# Altium PCB W5500-EVB-Pico2_V100.PcbDoc
Units mm, origin at the board's own origin, x right, y up, seen from the top; angles counter-clockwise.
Board outline 80 x 21 mm, 4 copper layers (Top Layer, Internal Plane 1 (Gnd), Internal Plane 2 (Vcc), Bottom Layer), stack 1.6 mm thick; 103 components, 95 nets, 455 pads, 192 vias.
Unrouted connection lines stored in the file: 78.
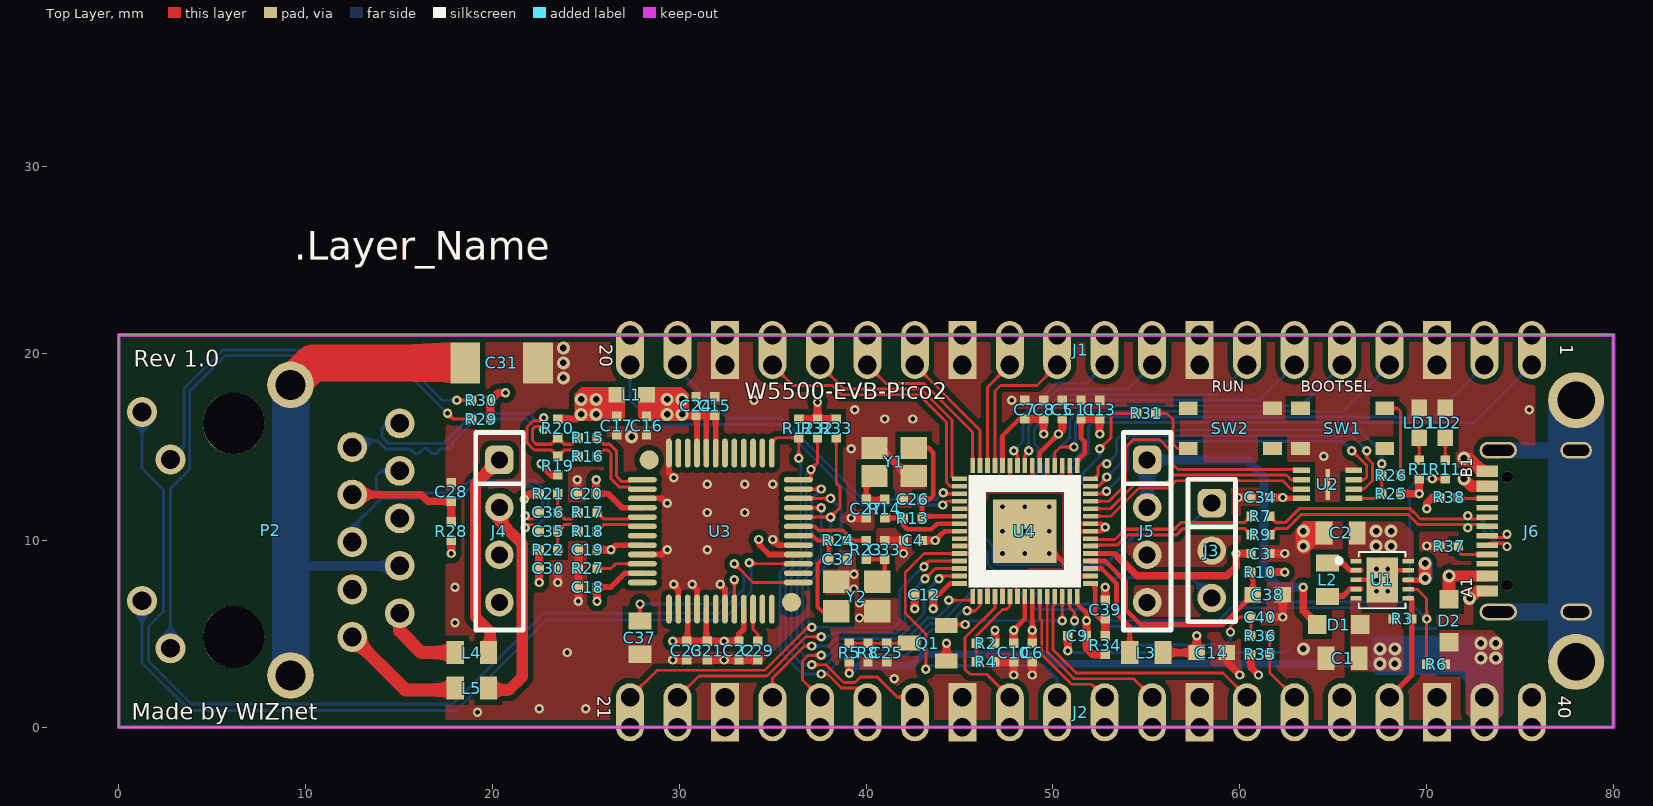
[diagram p0: Top Layer view]
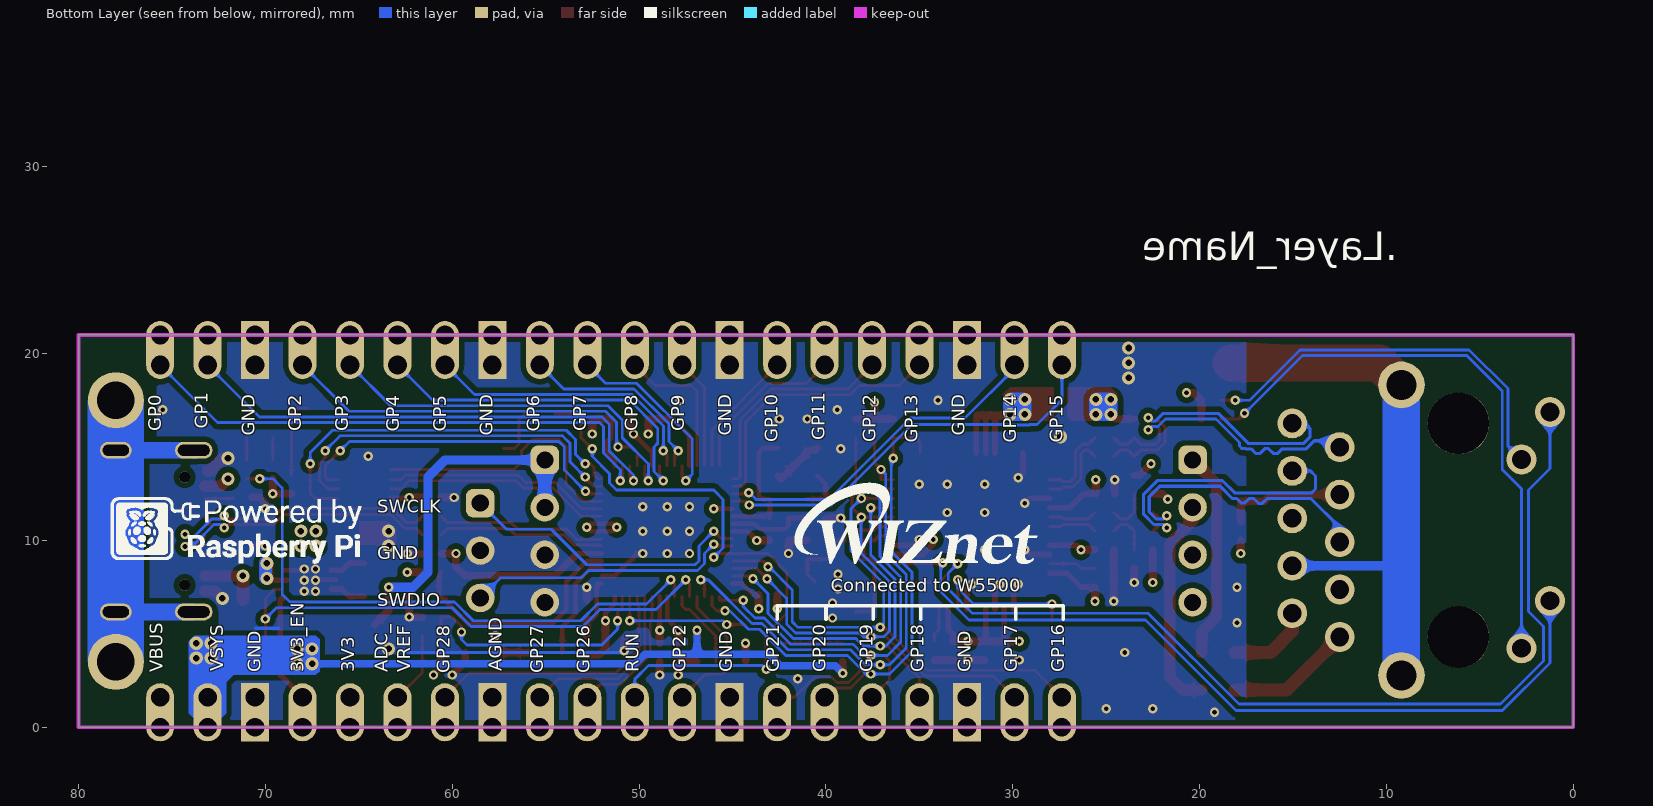
[diagram p1: Bottom Layer view, seen from below]
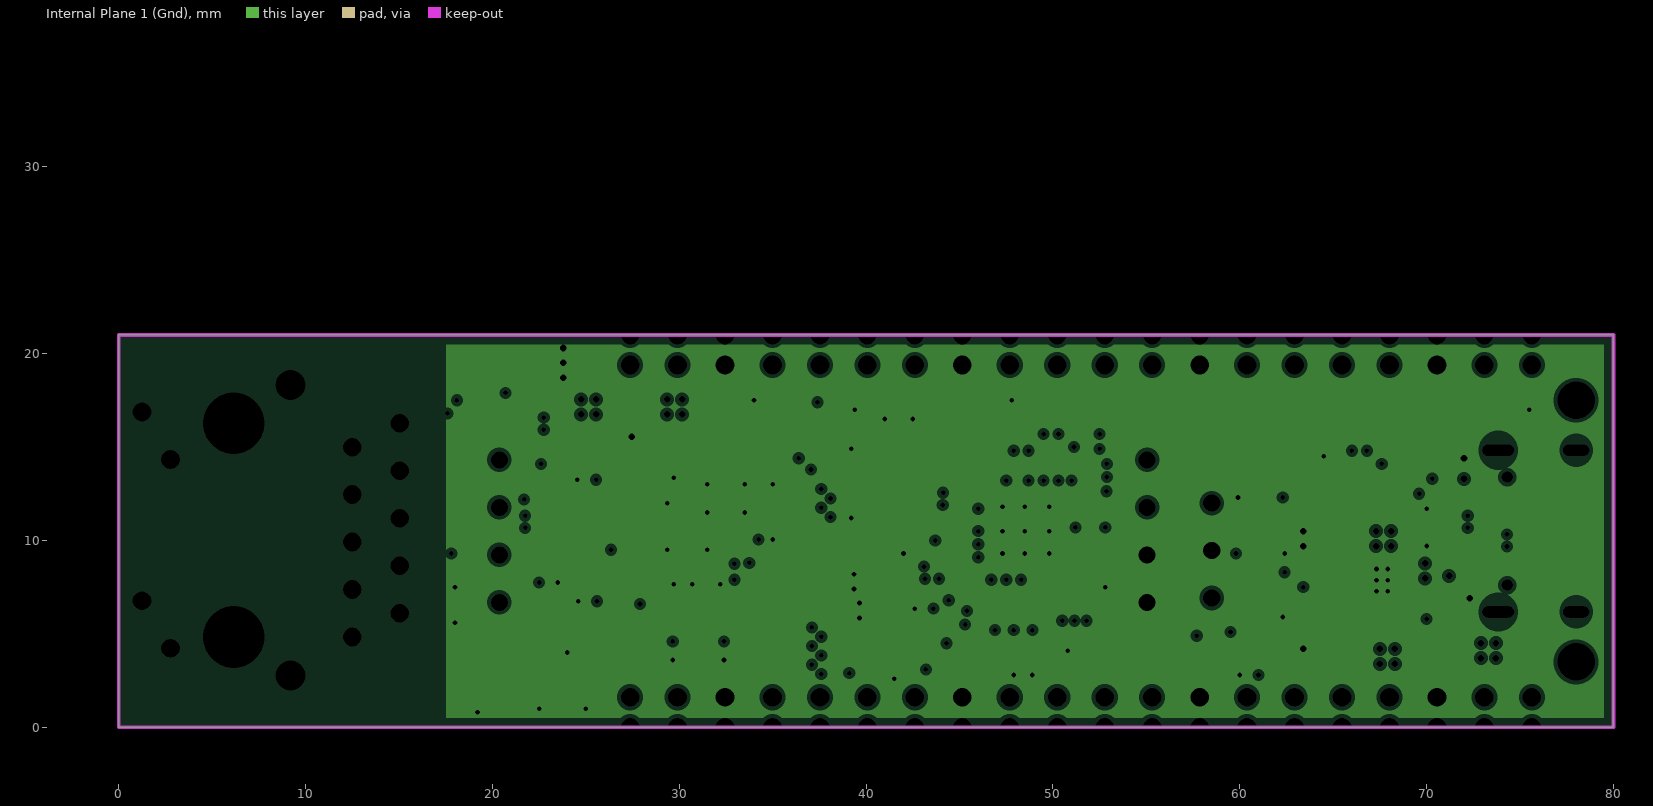
[diagram p2: Internal Plane 1 (Gnd), clearances drawn from the general rule]
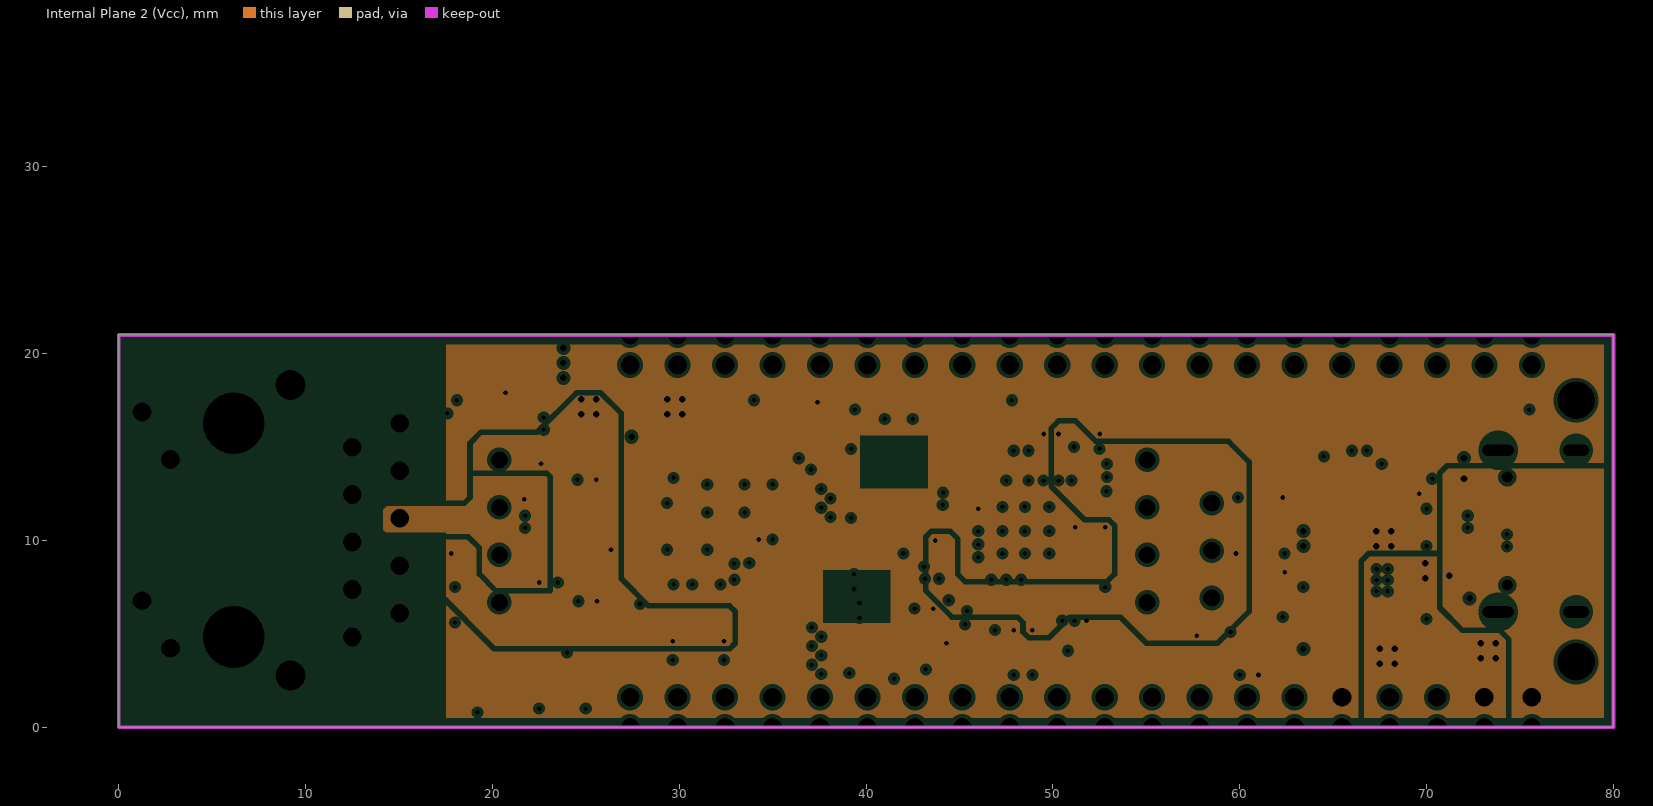
[diagram p3: Internal Plane 2 (Vcc), clearances drawn from the general rule]
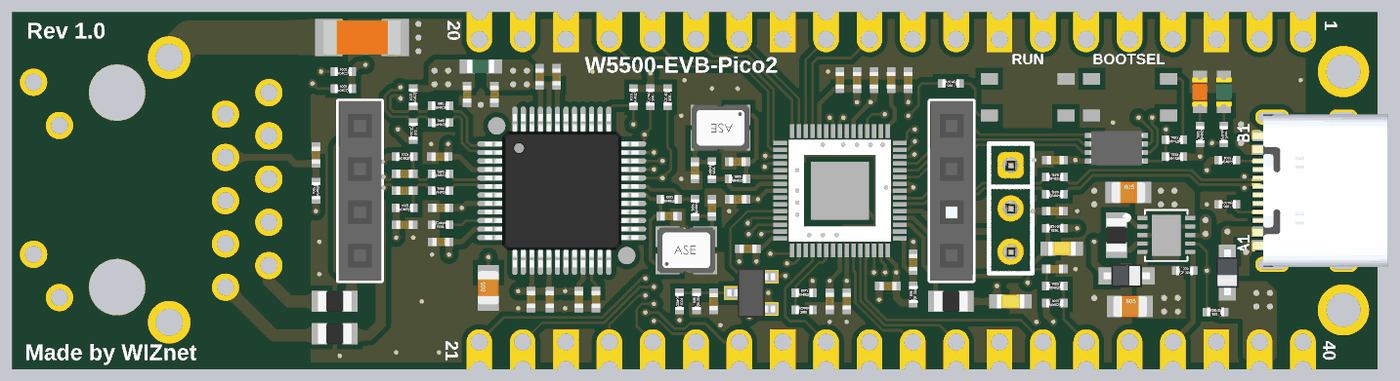
[diagram p4: 3D render of the assembled board from above, using the file's embedded part models]

## Layer stack, top to bottom
Top Solder: solder mask 0.01, Solder Resist, Dk 3.5
Top Layer: signal copper 0.05
Dielectric 1: prepreg 0.1, PP-006, Dk 4.1
Internal Plane 1 (Gnd): plane copper 0.1, net VREG_PGND
Dielectric1: prepreg 1.1, FR-4, Dk 4.8
Internal Plane 2 (Vcc): plane copper 0.1, net (Multiple Nets)
Dielectric 2: prepreg 0.1, PP-006, Dk 4.1
Bottom Layer: signal copper 0.05
Bottom Solder: solder mask 0.01, Solder Resist, Dk 3.5

## Board outline
0,0 80,0 80,21 0,21

## Design rules (kind name [scope] priority, off if disabled: settings)
BoardOutlineClearance [All] p1: gap=0.3 ignorepadtopadclearanceinfootprint=FALSE
Clearance [All] p1: gap=0.15 ignorepadtopadclearanceinfootprint=FALSE except(0.2: Arc-Hole Track-Hole SMDPad-Hole THPad-Hole Via-Hole Fill-Hole Poly-Hole Region-Hole Text-Hole; 0.3: Arc-Poly Track-Poly SMDPad-Poly THPad-Poly Via-Poly Fill-Poly Poly-Poly Poly-Region Poly-Text)
DiffPairsRouting [All] p1: maxlimit=0.135 minlimit=0.135 mostfreqgap=0.135 toplayer_minwidth=0.165 toplayer_maxwidth=0.165 toplayer_prefwidth=0.165 bottomlayer_minwidth=0.165 bottomlayer_maxwidth=0.165 bottomlayer_prefwidth=0.165 maxuncoupledlength=15.24
HoleSize [All] p1: absolutevalues=TRUE maxlimit=4.064 minlimit=0.025 maxpercent=80.000 minpercent=20.000
PlaneClearance [All] p1: clearance=0.2
PlaneConnect [All] p1: planeconnectstyle=Direct reliefexpansion=0.508 reliefentries=4 reliefconductorwidth=0.254 reliefairgap=0.254
PolygonConnect [All] p1: connectstyle=Direct reliefconductorwidth=0.6 reliefentries=4 polygonreliefangle="45 Angle" airgapwidth=0.35
RoutingVias [All] p1: holewidth=0.25 width=0.5 viastyle="Through Hole" minholewidth=0.2 minwidth=0.4 maxholewidth=0.4 maxwidth=0.8
SolderMaskExpansion [All] p1: expansion=0 istentingtop=FALSE
Width [All] p1: maxlimit=10 minlimit=0.075 preferedwidth=0.15
26 further rules are at their usual default settings.

## Classes and differential pairs
differential pair NewDifferentialPair4: +NetP2_R1 -NetP2_R2
differential pair NewDifferentialPair1: +NetC35_2 -NetC36_2

## Components (designator, comment, footprint, x,y, rotation, side; value= is the part's Value field where it differs from the comment)
C1 "10u" CAP-0805 65.5,3.7 r0 top
C2 "47u" CAP-0805 65.4,10.4 r0 top
C3 "0.1uF" CAP-0402 61.1,9.3 r180 top
C4 "1uF" CAP-0402 42.5,10 r0 top
C5 "0.1uF" CAP-0402 50.5,17 r270 top
C6 "0.1uF" CAP-0402 48.9,4 r90 top
C7 "1uF" CAP-0402 48.5,17 r270 top
C8 "0.1uF" CAP-0402 49.5,17 r270 top
C9 "0.1uF" CAP-0402 51.3,4.9 r0 top
C10 "0.1uF" CAP-0402 47.9,4 r90 top
C11 "0.1uF" CAP-0402 51.5,17 r270 top
C12 "0.1uF" CAP-0402 43.1,7.1 r0 top
C13 "0.1uF" CAP-0402 52.5,17 r270 top
C14 "10uF/1608" CAP-0603 58.5,4 r180 top
C15 "0.1uF" CAP-0402 31.9,17.2 r270 top
C16 "0.1uF" CAP-0402 28.25,16.15 r90 top locked
C17 "1uF" CAP-0402 26.65,16.15 r90 top locked
C18 "0.1uF" CAP-0402 25.1,7.5 r0 top locked
C19 "0.1uF" CAP-0402 25.1,9.5 r0 top locked
C20 "1uF" CAP-0402 25.05,12.5 r0 top locked
C21 "0.1uF" CAP-0402 31.5,4.1 r90 top
C22 "0.1uF" CAP-0402 33.2,4.1 r90 top
C23 "0.1uF" CAP-0402 30.4,4.1 r90 top
C24 "1uF" CAP-0402 30.9,17.2 r270 top
C25 "0.1uF" CAP-0402 41.1,4 r270 top
C26 "15pF" CAP-0402 42.5,12.2 r180 top
C27 "15pF" CAP-0402 40,11.7 r270 top
C28 "22nF" CAP-0402 17.8,12.6 r270 top locked
C29 "0.1uF" CAP-0402 34.2,4.1 r90 top
C30 "0.1uF" CAP-0402 23,8.5 r180 top locked
C31 "1nF/2kV" CAP-1808 20.5,19.5 r0 top locked
C32 "18pF" CAP-0402 38.5,9 r180 top
C33 "18pF" CAP-0402 41,9.5 r270 top
C34 "0.1uF" CAP-0402 61.1,12.3 r0 top
C35 "6.8nF" CAP-0402 23,10.5 r180 top locked
C36 "6.8nF" CAP-0402 23,11.5 r180 top locked
C37 "4.7uF" CAP-0805 27.9,4.8 r90 top locked
C38 "10uF/1608" CAP-0603 61.5,7.1 r180 top
C39 "2u2" CAP-0402 52.8,6.3 r270 top
C40 "2u2" CAP-0402 61.1,5.9 r180 top
D1 "BAT60A" SOD-323(1-C,2-A) 65.3,5.5 r180 top
D2 "BAT60A" SOD-323(1-C,2-A) 71.2,5.7 r90 top
J1 "2.54mm 1x20 Pin Header DIP" IDC-1X20 75.63,19.39 r180 top
J2 "2.54mm 1x20 Pin Header DIP" IDC-1X20 27.37,1.61 r0 top
J3 "2.54mm 1x3 Pin Header DIP" IDC-1X3 58.5,12 r270 top
J4 "Header Socket 1x4_2.54mm" IDC-1X4(SOCKET) 20.375,14.31 r270 top locked
J5 "Header Socket 1x4_2.54mm" IDC-1X4(SOCKET) 55.044,14.31 r270 top
J6 "*" USB-TYPE-C-31-M-12 78,10.5 r90 top
L1 "HH-1M1608-121JT" IND-0603 27.45,17.8 r180 top locked
L2 "2u2" IND-0805 64.7,7.9 r90 top
L3 "3u3" IND-0805 55,4 r0 top
L4 "0R" IND-0805 18.9,4 r0 top locked
L5 "0R" IND-0805 18.9,2.1 r0 top locked
LD1 "Red" LED-0603-RED 69.6,16.3 r90 top
LD2 "Green" LED-0603-GREEN 71,16.3 r90 top
P2 "RB1-ZZ-0049" RB1-ZZ-0049 6.15,10.55 r270 top locked
Q1 "Q-2N7002" SOT23-3L 43.3,4.5 r90 top
R1 "470R" RES-0402 69.6,13.8 r90 top
R2 "5.6K" RES-0402 46.4,4.5 r0 top
R3 "100K" RES-0402 68.7,5.8 r0 top
R4 "10K" RES-0402 46.4,3.5 r180 top
R5 "200K" RES-0402 39.1,4 r270 top
R6 "100K" RES-0402 70.51,3.378 r180 top
R7 "27R" RES-0402 61.1,11.3 r0 top
R8 "100K" RES-0402 40.1,4 r90 top
R9 "27R" RES-0402 61.1,10.3 r0 top
R10 "0R" RES-0402 61.1,8.3 r180 top
R11 "470R" RES-0402 71,13.8 r270 top
R12 "4.7K" RES-0402 36.4,16 r90 top
R13 "NC" RES-0402 42.5,11.2 r0 top
R14 "1K" RES-0402 41,11.7 r270 top
R15 "3.3R" RES-0402 25.1,15.5 r0 top locked
R16 "3.3R" RES-0402 25.1,14.5 r0 top locked
R17 "3.3R" RES-0402 25.1,11.5 r0 top locked
R18 "3.3R" RES-0402 25.1,10.5 r0 top locked
R19 "49.9R" RES-0402 23.5,14 r270 top locked
R20 "49.9R" RES-0402 23.5,16 r90 top locked
R21 "49.9R" RES-0402 23,12.5 r0 top locked
R22 "49.9R" RES-0402 23,9.5 r0 top locked
R23 "0R" RES-0402 40,9.5 r90 top
R24 "1M" RES-0402 38.5,10 r0 top
R25 "NC" RES-0402 68.1,12.5 r0 top
R26 "1K" RES-0402 68.1,13.5 r0 top
R27 "12.4K/1%" RES-0402 25.1,8.5 r180 top locked
R28 "10R/1%" RES-0402 17.8,10.5 r90 top locked
R29 "330R" RES-0402 19.4,16.5 r0 top locked
R30 "330R" RES-0402 19.4,17.5 r0 top locked
R31 "1K" RES-0402 55,16.8 r180 top
R32 "4.7K" RES-0402 37.4,16 r270 top
R33 "4.7K" RES-0402 38.4,16 r270 top
R34 "10R" RES-0402 52.8,4.4 r90 top
R35 "200R" RES-0402 61.1,3.9 r0 top
R36 "1R" RES-0402 61.1,4.9 r0 top
R37 "5.1k" RES-0402 71.2,9.7 r180 top
R38 "5.1k" RES-0402 71.2,12.3 r0 top
SW1 "RKB2SJK250SMTR LFS" SW-RKB2 65.5,16 r0 top
SW2 "RKB2SJK250SMTR LFS" SW-RKB2 59.5,16 r180 top
U1 "SGM62112-3.3" SGM62112 67.618,7.875 r0 top
U2 "W25Q16JVUXIQ" SON50P300X200X60-9N 64.7,13 r180 top
U3 "W5500" LQFP48(0.5/9.0) 32.2,10.5 r0 top
U4 "RP2350-A" QFN60(0.4/7X7) 48.5,10.5 r270 top
Y1 "12MHz" OSC-TZ1067B 41.5,14.2 r180 top
Y2 "25MHz" OSC-82J0626 39.5,7 r0 top

## Footprints (in the part's own frame and the unit in brackets; to place one, negate y for a bottom-side part, rotate by r counter-clockwise, add the part's x,y. Pads: shape width x height; smd on the part's side, far side on the other; paste and mask are expansions set on the pad)
CAP-0402 [mm]
  rect 0.5x0.5 smd: 1(-0.5,0) 2(0.5,0)
  body extent -0.48,-0.25 0.52,0.25, height 0.6
CAP-0603 [mm] "Ceramic CAP 0603(1608)"
  rect 0.89x0.82 smd: 1(-0.8,0) 2(0.8,0)
  body extent -0.93,-0.41 0.93,0.41, height 0.81
CAP-0805 [mil]
  rect 36x49 smd: 1(-35,0)
  rect 35.43x49 smd: 2(35,0)
  body extent -39,-24 40,25, height 31
CAP-1808 [mm] "Ceramic CAP 1808(4520)"
  rect 1.6x2.2 smd: 1(-1.95,0) 2(1.95,0)
  body extent -2.25,-1.02 2.25,1.01, height 2
IDC-1X3 [mil]
  rrect50% 60x60 hole 36: 1(0,0)
  round 60 hole 36: 2(100,0) 3(200,0)
  silkscreen extent -50,-50 250,50, body extent -49,-49 251,51, height 336
IDC-1X4(SOCKET) [mil]
  rrect50% 60x60 hole 36: 1(0,0)
  round 60 hole 36: 2(100,0) 3(200,0) 4(300,0)
  silkscreen extent -58,-50 358,50, body extent -58,-49 358,49, height 341
IDC-1X20 [mm]
  oval 1.5x2.5 hole 1 copper offset 0,-0.5: 1(0,0) 2(2.54,0) 4(7.62,0) 5(10.16,0) 6(12.7,0) 7(15.24,0) 9(20.32,0) 10(22.86,0) 11(25.4,0) 12(27.94,0) 14(33.02,0) 15(35.56,0) 16(38.1,0) 17(40.64,0) 19(45.72,0) 20(48.26,0)
  oval 1.5x2.5 hole 1 copper offset 0,0.5: 1(0,-1.61) 2(2.54,-1.61) 4(7.62,-1.61) 5(10.16,-1.61) 6(12.7,-1.61) 7(15.24,-1.61) 9(20.32,-1.61) 10(22.86,-1.61) 11(25.4,-1.61) 12(27.94,-1.61) 14(33.02,-1.61) 15(35.56,-1.61) 16(38.1,-1.61) 17(40.64,-1.61) 19(45.72,-1.61) 20(48.26,-1.61)
  rect 1.5x2.5 hole 1 copper offset 0,0.5: 3(5.08,-1.61) 8(17.78,-1.61) 13(30.48,-1.61) 18(43.18,-1.61)
  rect 1.5x2.5 hole 1 copper offset 0,-0.5: 3(5.08,0) 8(17.78,0) 13(30.48,0) 18(43.18,0)
IND-0603 [mm] "Inductor 0603(1608)"
  rect 0.89x0.82 smd: 1(-0.8,0) 2(0.8,0)
  body extent -0.8,-0.4 0.8,0.4, height 0.95
IND-0805 [mil]
  rect 36x49 smd: 1(-35,0)
  rect 35.43x49 smd: 2(35,0)
  Top Layer pour cut-out: -15,25 -15,-25 15,-25 15,25
  body extent -39,-24 39,24, height 37
LED-0603-GREEN [mm] "LED-0603-GREEN"
  rect 0.89x0.82 smd: 1(-0.8,0) 2(0.8,0)
  body extent -0.85,-0.45 0.85,0.45, height 0.9
LED-0603-RED [mm] "LED-0603-RED"
  rect 0.89x0.82 smd: 1(-0.8,0) 2(0.8,0)
  body extent -0.85,-0.45 0.85,0.45, height 0.9
LQFP48(0.5/9.0) [mm]
  round 1.016 smd: 0(-3.81,3.81) 0(3.81,-3.81)
  oval 1.55x0.3 smd: 1(-4.175,2.75) 2(-4.175,2.25) 3(-4.175,1.75) 4(-4.175,1.25) 5(-4.175,0.75) 6(-4.175,0.25) 7(-4.175,-0.25) 8(-4.175,-0.75) 9(-4.175,-1.25) 10(-4.175,-1.75) 11(-4.175,-2.25) 12(-4.175,-2.75) 25(4.175,-2.75) 26(4.175,-2.25) 27(4.175,-1.75) 28(4.175,-1.25) 29(4.175,-0.75) 30(4.175,-0.25) 31(4.175,0.25) 32(4.175,0.75) 33(4.175,1.25) 34(4.175,1.75) 35(4.175,2.25) 36(4.175,2.75)
  oval 0.3x1.55 smd: 13(-2.75,-4.175) 14(-2.25,-4.175) 15(-1.75,-4.175) 16(-1.25,-4.175) 17(-0.75,-4.175) 18(-0.25,-4.175) 19(0.25,-4.175) 20(0.75,-4.175) 21(1.25,-4.175) 22(1.75,-4.175) 23(2.25,-4.175) 24(2.75,-4.175) 37(2.75,4.175) 38(2.25,4.175) 39(1.75,4.175) 40(1.25,4.175) 41(0.75,4.175) 42(0.25,4.175) 43(-0.25,4.175) 44(-0.75,4.175) 45(-1.25,4.175) 46(-1.75,4.175) 47(-2.25,4.175) 48(-2.75,4.175)
  body extent -4.5,-4.5 4.5,4.5, height 1.5
OSC-82J0626 [mm]
  rect 1.4x1.2 smd: 1(-1.1,-0.8) 2(1.1,-0.8) 3(1.1,0.8) 4(-1.1,0.8)
  body extent -1.7,-1.35 1.7,1.35, height 1.06
OSC-TZ1067B [mm]
  rect 1.4x1.2 smd: 1(-1.05,-0.75) 2(1.05,-0.75) 3(1.05,0.75) 4(-1.05,0.75)
  body extent -1.7,-1.35 1.7,1.35, height 1.06
QFN60(0.4/7X7) [mm]
  rect 0.8x0.25 smd: 1(-3.5,2.8) 2(-3.5,2.4) 3(-3.5,2) 4(-3.5,1.6) 5(-3.5,1.2) 6(-3.5,0.8) 7(-3.5,0.4) 8(-3.5,0) 9(-3.5,-0.4) 10(-3.5,-0.8) 11(-3.5,-1.2) 12(-3.5,-1.6) 13(-3.5,-2) 14(-3.5,-2.4) 15(-3.5,-2.8) 31(3.5,-2.8) 32(3.5,-2.4) 33(3.5,-2) 34(3.5,-1.6) 35(3.5,-1.2) 36(3.5,-0.8) 37(3.5,-0.4) 38(3.5,0) 39(3.5,0.4) 40(3.5,0.8) 41(3.5,1.2) 42(3.5,1.6) 43(3.5,2) 44(3.5,2.4) 45(3.5,2.8)
  rect 0.25x0.8 smd: 16(-2.8,-3.5) 17(-2.4,-3.5) 18(-2,-3.5) 19(-1.6,-3.5) 20(-1.2,-3.5) 21(-0.8,-3.5) 22(-0.4,-3.5) 23(0,-3.5) 24(0.4,-3.5) 25(0.8,-3.5) 26(1.2,-3.5) 27(1.6,-3.5) 28(2,-3.5) 29(2.4,-3.5) 30(2.8,-3.5) 46(2.8,3.5) 47(2.4,3.5) 48(2,3.5) 49(1.6,3.5) 50(1.2,3.5) 51(0.8,3.5) 52(0.4,3.5) 53(0,3.5) 54(-0.4,3.5) 55(-0.8,3.5) 56(-1.2,3.5) 57(-1.6,3.5) 58(-2,3.5) 59(-2.4,3.5) 60(-2.8,3.5)
  rect 3.4x3.4 smd: 61(0,0)
  body extent -3.5,-3.5 3.5,3.5, height 1
RB1-ZZ-0049 [mm]
  round 3.3 hole 3.3: 0(-5.715,0) 0(5.715,0)
  round 1.6 hole 1: L1(6.325,-3.38) L2(3.785,-4.9) L3(-3.785,-3.38) L4(-6.325,-4.9) R1(-5.715,8.89) R2(-4.445,6.35) R3(-3.175,8.89) R4(-1.905,6.35) R5(-0.635,8.89) R6(0.635,6.35) R7(1.905,8.89) R8(3.175,6.35) R9(4.445,8.89) R10(5.715,6.35)
  round 2.5 hole 1.6: S1(-7.775,3.05) S2(7.775,3.05)
  Top Layer pour cut-out: -6.3,1.65 -6.3,5.4 -5.1,5.4 -5.1,1.65
  Top Layer pour cut-out: 5.13,1.65 5.13,5.4 6.33,5.4 6.33,1.65
  Top Layer pour cut-out: -2.6,-8.3 -2.6,-5.4 2.6,-5.4 2.6,-8.3
  Top Layer pour cut-out: -8.8,-7.6 8.8,-7.6 8.8,-4.6 -8.8,-4.6
  body extent -7.9,-10.9 8,10.9, height 13.35
RES-0402 [mm]
  rect 0.5x0.5 smd: 1(-0.5,0) 2(0.5,0)
  body extent -0.5,-0.25 0.5,0.25, height 0.35
SGM62112 [mm]
  rect 0.6x0.24 smd paste+0 mask+0: 1(-1.406,1.025) 2(-1.406,0.525) 3(-1.406,0.025) 4(-1.406,-0.475) 5(-1.406,-0.975) 6(1.394,-0.975) 7(1.394,-0.475) 8(1.394,0.025) 9(1.394,0.525) 10(1.394,1.025)
  rect 1.7x2.4 smd paste+0 mask+0: 9(0,0)
  silkscreen extent -2.43,-1.5 1.25,1.5
SOD-323(1-C,2-A) [mm]
  rect 1x1 smd: 1(-1.15,0) 2(1.15,0)
  body extent -1.35,-0.67 1.35,0.68, height 0.79
SON50P300X200X60-9N [mm]
  rect 0.9x0.3 smd: 1(-1.4,0.75) 2(-1.4,0.25) 3(-1.4,-0.25) 4(-1.4,-0.75) 5(1.4,-0.75) 6(1.4,-0.25) 7(1.4,0.25) 8(1.4,0.75)
  rect 0.25x1.65 smd: 9(0,0)
  body extent -1.55,-1 1.55,1, height 0.6
SOT23-3L [mm]
  rect 0.8x1.2 smd paste-0.07: 1(-0.95,-1) 2(0.95,-1) 3(0,1)
  body extent -1.45,-1.4 1.45,1.4, height 1.28
SW-RKB2 [mm]
  rect 1x0.7 smd: 1(-2.25,1.075) 2(2.25,1.075) 3(-2.25,-1.075) 4(2.25,-1.075)
  body extent -2.1,-1.6 2.1,1.6, height 2.5
USB-TYPE-C-31-M-12 [mm]
  rect 0.6x1.14 smd mask+0.05: A1_B12(-3.2,4.75) A4_B9(-2.4,4.75) B1_A12(3.2,4.75) B4_A9(2.4,4.75)
  rect 0.3x1.14 smd mask+0.05: A5(-1.25,4.75) A6(-0.25,4.75) A7(0.25,4.75) A8(1.25,4.75) B5(1.75,4.75) B6(0.75,4.75) B7(-0.75,4.75) B8(-1.75,4.75)
  oval 0.9x2 hole 0.6 slot 1.7 at 90 deg: S1(-4.325,4.17) S2(4.325,4.17)
  oval 0.9x1.7 hole 0.6 slot 1.4 at 90 deg: S3(-4.325,0) S4(4.325,0)
  round 0.6 hole 0.6 unplated: ""(-2.89,3.68) ""(2.89,3.68)
  body extent -4.47,-2.6 4.47,5.31, height 3.31

## Part data
C1 C2: library part CAP-0805, "MLCC-0805(2012)"
C3 C4 C5 C6 C7 C8 C9 C10 C11 C12 C13 C15 C16 C17 C18 C19 C20 C21 C22 C23 C24 C25 C26 C27 C28 C29 C30 C32 C33 C34 C35 C36 C39 C40: library part CAP-0402, "Ceramic CAP 0402(1005)"
C14 C38: library part CAP-0603, "MLCC-0603(1608)"
C31: library part CAP-1808, "MLCC-1808(4520)"
C37: library part CAP-0805, "Ceramic CAP 0805(2012)"
D1 D2: library part DIODE-BAT60A, "Silicon Schottky Diode"
J4 J5: "Connector", Manufacturer_Name=Harwin, Manufacturer_Part_Number=M20-7820442, Mouser Part Number=855-M20-7820442, Datasheet Link=https://cdn.harwin.com/pdfs/M20-782.pdf, Height=8.65mm, Mouser Price/Stock=https://www.mouser.co.uk/ProductDetail/Harwin/M20-7820442?qs=vF78I%252BjhbY9ZgDLCXkGx4w%3D%3D
J6: library part TYPE-C-31-M-12, "USB Connectors 24 Receptacle 1 8.94*7.3mm RoHS", Package=Package, Availability="Not in stock", Check_prices=https://www.snapeda.com/parts/TYPE-C-31-M-12/HRO+Electronics+Co.%252C+Ltd./view-part/?ref=eda, MF="HRO Electronics Co., Ltd.", MP=TYPE-C-31-M-12, Price=None, SnapEDA_Link=https://www.snapeda.com/parts/TYPE-C-31-M-12/HRO+Electronics+Co.%252C+Ltd./view-part/?ref=snap
L1 L4 L5: library part IND-0603, "Inductor 0603(1608)"
L2 L3: library part IND-0805, "Inductor 0805(2012)"
LD1 LD2: library part LED-0603, "LED-0603"
P2: "PoE RJ45"
Q1: "N-Channel 60-V (D-S) MOSFET"
R1 R2 R3 R4 R5 R6 R8 R10 R11 R12 R13 R14 R15 R16 R17 R18 R19 R20 R21 R22 R23 R24 R25 R26 R27 R28 R29 R30 R31 R32 R33 R34 R35 R36 R37 R38: library part RES-0402, "RES-0402"
R7 R9: library part RES-0603, "Chip Resistor 0603(1608)", Case Code (Imperial)=0603, Case Code (Metric)=1608, Manufacturer=Yageo, Max Operating Temperature=155degC, Max Power Dissipation=100mW, Min Operating Temperature=-55degC, Package Description="2-Pin Surface Mount Device, Body 1.6 x 0.8 mm", Package Quantity=1, Resistance=1.5KOhm, Temperature Coefficient=100ppm/degreesC, Tolerance=1%, Voltage Rating=50V, Case/Package=0603, Composition=ThickFilm, Datasheet URL=http://www.yageo.com/NewPortal/yageodocoutput?fileName=/pdf/R-Chip/PYu-RC_Group_51_RoHS_L_5.pdf, Datasheet Version="Rev. 5, 10/2016", Depth=0.8mm, Height=0.022inch, Lead Free=LeadFree, Length=0.063inch, Manufacturer URL=http://www.yageo.com/, Military Standard=Not, Number of Pins=2, Number of Terminations=2, Package Reference=0603, Packaging=TapeandReel, Power Rating=100mW, REACH SVHC=NoSVHC, RoHSCompliant=true, Termination=SMD/SMT, Voltage Rating (DC)=50V, Width=0.031inch
SW1 SW2: library part CMP-10040-000001-2, "RKB2 DC 12V 50 mA max. 200mΩ max. 100MΩ 250 gf, -40˚C to 90˚C", Case/Package=SMD/SMT, Color=Black, Current Rating=50mA, Max Operating Temperature=85°C, Min Operating Temperature=-40°C, Operating Force=160gf, Package Quantity=2900, Voltage Rating (DC)=16V, Actuator Type=Standard, Contact Plating=Silver, Depth=4.6mm, Illumination Type=Non-Illuminated, Lead Free="Lead Free", Length=3.2mm, Max Current Rating=50mA, Mechanical Life=150000Cycles, Mount="Surface Mount", Orientation=Straight, Packaging="Tape and Reel", RoHS Compliant=Yes, Switch Function=Off-Mom, Switch Travel=0.15mm, Termination=J-Bend, Throw Configuration=SPST
U1: "Buck-Boost Switching Regulator IC Positive Adjustable 1.8V 1 Output 800mA 10-WFDFN Exposed Pad", Package="WFDFN-10 Richtek", Digi-Key_Part_Number=1028-1259-1-ND, Digi-Key_Purchase_URL=https://www.digikey.com/product-detail/en/richtek-usa-inc/RT6150AGQW/1028-1259-1-ND/4733181?utm_source=snapeda&utm_medium=aggregator&utm_campaign=symbol, MF="Richtek USA", MP=RT6150AGQW, SnapEDA_Link=https://www.snapeda.com/parts/RT6150AGQW/Richtek%20USA%20Inc./view-part/1219544/?ref=snap
U2: library part W25Q16JVZPIM, "3V 16M-BIT / SERIAL FLASH MEMORY WITH / DUAL/QUAD SPI, QPI & DTR"
U3: "WIZnet Hardwired TCP/IP Chip"
U4: "Raspverry Pi, ARM Cortex-M3+ @ 133MHz"
Y1: library part OSC-TZ1067B-12MHz, "X-tal 12MHz,3.2x2.5 SMD, CL=20pF"
Y2: library part OSC-82J0626-25MHz, "X-tal 25MHz,3.2x2.5 SMD, CL=18pF"

## Free pads (board coordinates)
  round 0 on Mech16 paste+0 mask+0: 1(71.2,16.4) 1(74.4,35.9)
  round 3 hole 2: 1(78,3.5) 1(78,17.5)

## Via types
v1: diameter 0.5, hole 0.25, Top Layer to Bottom Layer, tented both sides, 159 vias
v2: diameter 0.7, hole 0.35, Top Layer to Bottom Layer, tented both sides, 33 vias

## Nets (pads, with @x,y where several pads share a name; then routed paths per layer and width w, separated by ;. In a path a pad name is that pad's centre, name@x,y a point inside that pad or via, vN(x,y) a via of type N, cw(c..) or ccw(c..) an arc to the next point about the centre after c; other vN are vias at no path point)
3V3: C2.2 C7.2 C8.2 C9.2 C10.2 C11.2 C12.2 C13.2 C15.2 C16.2 C24.2 C34.2 J2.16 L1.1 Q1.1 R1.1 R10.1 R12.2 R25.2 R29.2 R30.2 R32.1 R33.1 R34.1 R35.1 U1.1 U1.10 U2.8 U3.28 U3.43 U3.44 U3.45 U4.1 U4.11 U4.20 U4.30 U4.38 U4.45 U4.53 U4.54 | length 45.1
  Top Layer w0.25: C12.2 43.9,7.1 44.5,7.7 U4.30 ; U4.20 v1(46,11.7) ; U4.11 47.3,15.6 48.2,16.5 C7.2 ; v1(47.9,5.2) 48.5,5.8 U4.38 ; U4.45 51.3,6.6 51.8,6.1 v1(51.8,5.7) ; U4.1 51.3,14.275 51.7,14.675 51.7,15.3 51.5,15.5 C11.2 ; v1(51.2,10.7) 51.4,10.5 U4.53 52.6,10.5 v1(52.8,10.7) 52.6,10.9 U4.54 51.4,10.9 v1(51.2,10.7)
  Top Layer w0.3: C24.2 30.95,16.65 U3.45 ; U3.44 31.45,16.65 ; C15.2 31.95,16.65 U3.43 ; v1(34.25,10.05) 34.25,9.8 34.8,9.25 U3.28 ; v1(62.3,12.3) 62.35,12.25 U2.8
  Top Layer w0.4: R29.2 R30.2 20.3,17.9 v1(20.7,17.9) ; v2(30.15,16.75) 30.2,16.7 C24.2 C15.2 ; R12.2 R32.1 ; v1(37.4,17.4) R32.1 ; R33.1 R32.1 ; v1(43.6,6.35) C12.2 ; Q1.1 v1(44.3,4.5) ; C10.2 v1(47.9,5.2) ; C7.2 C8.2 v1(49.5,15.7) ; C11.2 C13.2 v1(52.5,15.7) ; C9.2 51.8,4.2 52.1,3.9 R34.1 ; C9.2@51.8,4.95 v1(51.8,5.7) ; R35.1 60.6,3.2 v1(61,2.8) ; R10.1 v1(62.4,8.3) ; C34.2 v1(62.3,12.3) ; R25.2 v1(69.6,12.5) R1.1
  other v2: 67.3,9.7 68.1,9.7 67.3,10.5 68.1,10.5 29.35,16.75 29.35,17.55 30.15,17.55
3V3_EN: J2.17 R3.2 U1.6 | length 5.9
  Top Layer w0.3: J2.17@68.01,1.61 69.2,2.8 69.2,6.832 69.132,6.9 U1.6
3V3A: C17.2 C18.2 C19.2 C20.2 C21.2 C22.2 C23.2 L1.2 R19.2 R20.2 R28.1 U3.4 U3.8 U3.11 U3.15 U3.17 U3.21 | length 21.5
  Top Layer w0.3: C20.2 26.2,12.5 26.95,11.75 U3.4 ; C18.2 26.35,7.5 27.1,8.25 U3.11 ; v1(26.35,9.5) 26.6,9.75 U3.8 ; C23.2@30.45,4.6 U3.15 ; C21.2@31.45,4.6 U3.17 ; C22.2 33.2,5 33.45,5.25 U3.21
  Top Layer w0.4: v1(17.8,9.3) R28.1 ; v1(22.6,14.1) 23.2,13.5 R19.2 ; R20.2 24.5,16.5 v2(24.75,16.75) ; C20.2 v1(25.55,13.25) ; v1(25.6,6.75) C18.2 ; C19.2 v1(26.35,9.5) ; v1(29.65,4.6) C23.2 30.45,4.6 C21.2@31.45,4.6 ; C21.2 v1(32.4,4.6) C22.2
  other v2: 25.55,16.75 24.75,17.55 25.55,17.55
ACTn: P2.L2 U3.27 | length 43.8
  Top Layer w0.15: v1(33.75,8.8) 33.8,8.75 U3.27
  Bottom Layer w0.15: P2.L2 1.25,3.45 3.8,0.9 18.045,0.9 22.895,5.75 32.35,5.75 33.85,7.25 33.85,8.7 v1(33.75,8.8)
ADC_VREF: J2.15 R35.2 R36.2 | length 3.8
  Top Layer w0.15: R36.2 R35.2 61.6,2.94 J2.15@62.93,1.61
CGND: C31.1 J6.S1 J6.S2 J6.S3 J6.S4 P2.R7 P2.S1 P2.S2 pad.1@78,3.5 pad.1@78,17.5 | length 53.3
  Top Layer w2: P2.S1 10.375,19.5 C31.1@18.3,19.5
  Bottom Layer w0.15: 9.2,8.7 9.255,8.645
  Bottom Layer w0.5: 9.255,8.645 P2.R7
  Bottom Layer w0.9: J6.S2@73.8,14.8 73.825,14.825 J6.S2 J6.S4 ; J6.S1 J6.S3@77.875,6.175 ; pad.1@78,3.5 J6.S3 J6.S4 ; pad.1@78,17.5 J6.S4
  Bottom Layer w2: P2.S2 9.2,8.7 P2.S1
GPIO0: J1.1 U4.2 | length 29.2
  Top Layer w0.15: U4.2 50.9,13.3 v1(51,13.2)
  Bottom Layer w0.15: v1(51,13.2) 51,13.776 51.9,14.676 51.9,16.1 52.112,16.312 72.552,16.312 J1.1@75.63,19.39
GPIO1: J1.2 U4.3 | length 27.2
  Top Layer w0.15: v1(50.3,13.2) 50.5,13.4 U4.3
  Bottom Layer w0.15: v1(50.3,13.2) 50.3,13.5 51.6,14.8 51.6,16.224 51.988,16.612 70.312,16.612 J1.2@73.09,19.39
GPIO2: J1.4 U4.4 | length 21.3
  Top Layer w0.15: U4.4 50.1,14.7 50.4,15 v1(51.125,15)
  Bottom Layer w0.15: v1(51.125,15) 51.2,15 51.2,16.324 51.788,16.912 65.532,16.912 J1.4@68.01,19.39
GPIO3: J1.5 U4.5 | length 20.5
  Top Layer w0.15: v1(49.5,13.2) 49.7,13.4 U4.5
  Bottom Layer w0.15: v1(49.5,13.2) 49.5,14.1 50.9,15.5 50.9,16.449 51.664,17.212 63.292,17.212 J1.5@65.47,19.39
GPIO4: J1.6 U4.7 | length 19.3
  Top Layer w0.15: v1(48.7,13.2) 48.9,13.4 U4.7
  Bottom Layer w0.15: v1(48.7,13.2) 49.2,13.7 49.2,15 49,15.2 49,16 50.512,17.512 61.052,17.512 J1.6@62.93,19.39
GPIO5: J1.7 U4.8 | length 15.2
  Top Layer w0.15: U4.8 48.5,14.6 v1(48.7,14.8)
  Bottom Layer w0.15: v1(48.7,14.8) 48.7,16.124 50.388,17.812 58.812,17.812 J1.7@60.39,19.39
GPIO6: J1.9 U4.9 | length 10.7
  Top Layer w0.15: v1(47.9,14.8) 48.1,14.6 U4.9
  Bottom Layer w0.15: v1(47.9,14.8) 48.4,15.3 48.4,16.249 50.264,18.112 54.032,18.112 J1.9@55.31,19.39
GPIO7: J1.10 U4.10 | length 10.5
  Top Layer w0.15: v1(47.5,13.2) 47.7,13.4 U4.10
  Bottom Layer w0.15: v1(47.5,13.2) 47.15,13.55 47.15,15.423 50.139,18.412 51.792,18.412 J1.10@52.77,19.39
GPIO8: J1.11 U4.12 | length 7.9
  Top Layer w0.15: U4.12 46.9,18 47.2,18.3 49.14,18.3 J1.11@50.23,19.39
GPIO9: J1.12 U4.13 | length 5.9
  Top Layer w0.15: U4.13 46.5,18.2 J1.12@47.69,19.39
GPIO10: J1.14 U4.14 | length 6.8
  Top Layer w0.15: J1.14@42.61,19.39 46.1,15.9 U4.14
GPIO11: J1.15 U4.15 | length 8.9
  Top Layer w0.15: J1.15@40.07,19.39 41.06,18.4 43.1,18.4 45.7,15.8 U4.15
GPIO12: J1.16 U4.16 | length 11.8
  Top Layer w0.15: J1.16@37.53,19.39 38.52,18.4 38.82,18.1 42.949,18.1 44.6,16.449 44.6,13.4 44.7,13.3 U4.16
GPIO13: J1.17 U4.17 | length 14.6
  Top Layer w0.15: J1.17@34.99,19.39 36.08,18.3 38.196,18.3 38.696,17.8 42.824,17.8 44.3,16.324 44.3,13.1 44.5,12.9 U4.17
GPIO14: J1.19 U4.18 | length 18.4
  Top Layer w0.15: v1(44.125,12.55) 44.1,12.525 44.1,12.5 U4.18
  Bottom Layer w0.15: J1.19@29.91,19.39 29.91,19.19 32.55,16.55 35.476,16.55 39.826,12.2 43.728,12.2 43.903,12.375 43.95,12.375 v1(44.125,12.55)
GPIO15: J1.20 U4.19 | length 21.9
  Top Layer w0.15: v1(44.1,11.9) 44.3,12.1 U4.19
  Bottom Layer w0.15: J1.20@27.37,19.39 27.37,17.53 28.7,16.2 29.087,16.2 29.112,16.175 29.257,16.175 30.243,16.175 30.388,16.175 30.413,16.2 35.401,16.2 39.701,11.9 v1(44.1,11.9)
GPIO16: J2.1 U3.34 U4.27 | length 31.3
  Top Layer w0.15: J2.1@27.37,1.61 28.81,3.05 34.563,3.05 36.863,5.35 v1(37.1,5.35) ; U3.34 v1(38.1,12.25) ; v1(43.1,8.6) 43.1,8.65 43.35,8.9 U4.27
  Bottom Layer w0.15: v1(38.1,12.25) 38.65,11.7 38.65,9.429 36.9,7.679 36.9,5.55 v1(37.1,5.35) 41.501,5.35 41.8,5.649 41.8,7.35 43.05,8.6 v1(43.1,8.6)
GPIO17: J2.2 R33.2 U3.32 U4.28 | length 32.9
  Top Layer w0.15: J2.2@29.91,1.61 31.05,2.75 34.687,2.75 36.787,4.85 v1(37.6,4.85) ; U3.32 v1(38.1,11.25) 38.6,11.75 38.6,12.85 38.4,13.05 R33.2 ; v1(43.15,7.95) 43.7,8.5 U4.28
  Bottom Layer w0.15: v1(38.1,11.25) 38.125,11.225 38.125,9.328 36.6,7.803 36.6,5.15 36.9,4.85 v1(37.6,4.85) 38,4.85 38.2,5.05 41.626,5.05 42.1,5.524 42.1,6.9 v1(43.15,7.95)
GPIO18: J2.4 U3.33 U4.29 | length 23.6
  Top Layer w0.15: J2.4@34.99,1.61 34.99,2.628 36.712,4.35 v1(37.1,4.35) ; U3.33 v1(37.6,11.75) ; v1(43.9,7.95) 44.05,8.1 U4.29
  Bottom Layer w0.15: v1(37.6,11.75) 37.6,9.227 36.3,7.927 36.3,4.85 36.8,4.35 v1(37.1,4.35) 38,4.35 38.4,4.75 41.75,4.75 43.1,6.1 43.1,7.15 v1(43.9,7.95)
GPIO19: J2.5 U3.35 U4.31 | length 25.1
  Top Layer w0.15: U3.35 v1(37.6,12.75) ; J2.5@37.53,1.61 36.6,2.54 36.6,3.55 36.9,3.85 v1(37.6,3.85) ; v1(44.425,6.8) 45.7,6.8 U4.31
  Bottom Layer w0.15: v1(37.6,12.75) 37.1,12.25 37.1,9.151 36,8.051 36,4.55 36.7,3.85 v1(37.6,3.85) 37.95,3.85 38.55,4.45 41.901,4.45 43.301,5.85 43.8,5.85 44.425,6.475 v1(44.425,6.8)
GPIO20: J2.6 R12.1 U3.37 U4.32 | length 30.3
  Top Layer w0.15: U3.37 34.95,15.25 35.2,15.5 R12.1 v1(36.4,14.4) ; v1(37.6,2.85) 37.926,2.85 38.676,2.1 39.58,2.1 J2.6@40.07,1.61 ; v1(45.4,6.232) 45.832,6.232 46.1,6.5 U4.32
  Bottom Layer w0.15: v1(36.4,14.4) 36.5,14.3 36.5,9.4 35.4,8.3 35.4,4.05 36.6,2.85 v1(37.6,2.85) 37.85,2.85 38.85,3.85 42.15,3.85 43.55,5.25 44.15,5.25 45.132,6.232 v1(45.4,6.232)
GPIO21: J2.7 R32.2 U3.36 U4.33 | length 33.9
  Top Layer w0.15: U3.36 37.05,13.25 v1(37.05,13.8) 37.4,14.15 R32.2 ; v1(37.1,3.35) 37.85,3.35 38.8,2.4 39.4,2.4 39.7,2.7 40.6,2.7 41.69,1.61 J2.7@42.61,1.61 ; U4.33 46.5,7.7 v1(46.7,7.9)
  Bottom Layer w0.15: v1(37.05,13.8) 36.8,13.55 36.8,9.276 35.7,8.176 35.7,4.25 36.6,3.35 v1(37.1,3.35) 37.874,3.35 38.674,4.15 42.026,4.15 43.426,5.55 43.95,5.55 46.3,7.9 v1(46.7,7.9)
GPIO22: J2.9 U4.34 | length 7.6
  Top Layer w0.15: U4.34 46.9,6.4 45.3,4.8 45.3,3.1 45.557,2.843 46.457,2.843 J2.9@47.69,1.61
GPIO23: R6.2 U1.7 U4.35 | length 29.8
  Top Layer w0.15: U4.35 47.3,7.7 v1(47.5,7.9) ; U1.7@69.094,7.425 69.139,7.38 69.52,7.38 70,6.9 v1(70,5.8) 70,3.389 R6.2
  Bottom Layer w0.15: v1(47.5,7.9) 49.1,6.3 52.1,6.3 53,5.4 59,5.4 60,6.4 69.4,6.4 v1(70,5.8)
GPIO24: R2.1 R4.2 U4.36 | length 4.4
  Top Layer w0.15: R4.2 R2.1 45.9,4.9 47.3,6.3 47.5,6.3 47.7,6.5 U4.36
GPIO25: R11.2 U4.37 | length 31.1
  Top Layer w0.15: U4.37 48.1,7.7 v1(48.3,7.9) ; v1(70.3,13.3) R11.2
  Bottom Layer w0.15: v1(48.3,7.9) 49.6,6.6 52.224,6.6 53.124,5.7 58.876,5.7 59.876,6.7 68.676,6.7 69.1,7.124 69.1,12.8 69.6,13.3 v1(70.3,13.3)
GPIO26/ADC0: J2.11 U4.40 | length 7.5
  Top Layer w0.15: U4.40 49.3,5.8 49.4,5.7 49.4,3.9 50.9,2.4 51,2.3 52.08,2.3 J2.11@52.77,1.61
GPIO27/ADC1: J2.12 U4.41 | length 9.6
  Top Layer w0.15: U4.41 49.7,5.824 49.7,4.024 50.824,2.9 51.124,2.6 54.32,2.6 J2.12@55.31,1.61
GPIO28/ADC2: J2.14 U4.42 | length 14.3
  Top Layer w0.15: U4.42 50.1,6.557 50,6.457 50,4.149 51.249,2.9 59.1,2.9 J2.14@60.39,1.61
GPIO29/ADC3: Q1.2 U4.43 | length 7.6
  Top Layer w0.15: Q1.2 44.35,5.5 v1(45.3,5.5) ; v1(50.5,5.7) U4.43
  Bottom Layer w0.15: v1(45.3,5.5) 45.5,5.7 v1(50.5,5.7)
LINKn: P2.L4 U3.25 | length 54.9
  Top Layer w0.15: v1(32.95,8.75) 33.95,7.75 U3.25
  Bottom Layer w0.15: P2.L4 1.25,13.85 2.4,12.7 2.4,6.2 1.6,5.4 1.6,3.55 3.9,1.25 17.9,1.25 22.75,6.1 32.15,6.1 33.45,7.4 33.45,8.25 v1(32.95,8.75)
NetC25_1: C25.1 Q1.3 R5.1 R8.2 | length 3.2
  Top Layer w0.15: R5.1 R8.2 C25.1 Q1.3
NetC27_1: C27.1 R14.1 Y1.3 | length 2.4
  Top Layer w0.25: Y1.3 40,13 C27.1 R14.1
NetC28_2: C28.2 P2.R4 R28.2 | length 6.5
  Top Layer w0.4: P2.R4 16.195,12.455 16.55,12.1 C28.2 R28.2
NetC29_2: C29.2 U3.22 | length 1.8
  Top Layer w0.15: U3.22 33.95,5.25 34.2,5 C29.2
NetC30_2: C30.2 P2.R5 R21.1 R22.1 | length 2.7
  Top Layer w0.4: v1(21.7,12.2) 22,12.5 R21.1 ; v1(22.5,7.75) C30.2 R22.1
NetC33_2: C33.2 R23.1 Y2.3 | length 2.4
  Top Layer w0.2: R23.1 C33.2 41,8.2 Y2.3
NetC35_1: C35.1 R18.1 R22.2 | length 2.4
  Top Layer w0.15: R22.2 C35.1
  Top Layer w0.165: C35.1 23.85,10.85 24.25,10.85 R18.1
NetC35_2: C35.2 P2.R3 | length 15.5
  Top Layer w0.165: v1(21.75,10.675) 21.925,10.85 22.15,10.85 C35.2
  Bottom Layer w0.165: P2.R3 14.075,13.725 13.8,13.45 13.8,12.75 14,12.55 18.126,12.55 18.776,13.2 22.266,13.2 22.995,12.471 22.995,11.395 22.45,10.85 21.925,10.85 v1(21.75,10.675)
NetC36_1: C36.1 R17.1 R21.2 | length 2.4
  Top Layer w0.15: C36.1 R21.2
  Top Layer w0.165: C36.1 23.85,11.15 24.25,11.15 R17.1
NetC36_2: C36.2 P2.R6 | length 15.5
  Top Layer w0.165: v1(21.75,11.325) 21.925,11.15 22.15,11.15 C36.2
  Bottom Layer w0.165: P2.R6 12.5,10.7 14.05,12.25 16.3,12.25 16.383,12.25 16.645,11.988 16.845,11.988 17.107,12.25 17.347,12.25 17.582,12.015 17.782,12.015 18.017,12.25 18.1,12.25 18.25,12.25 18.9,12.9 22.142,12.9 22.695,12.347 22.695,11.519 22.326,11.15 21.925,11.15 v1(21.75,11.325)
NetC37_2: C37.2 U3.20 | length 8.3
  Top Layer w0.15: C37.2 v1(27.9,6.6) ; U3.20 v1(32.95,7.9)
  Bottom Layer w0.15: v1(27.9,6.6) 32.1,6.6 32.95,7.45 v1(32.95,7.9)
NetC40_2: C40.2 R36.1 U4.44 | length 13.7
  Top Layer w0.15: U4.44 50.9,6.4 51.15,6.15 v1(51.15,5.7) ; v1(59.5,5.1) 59.5,5.4 60,5.9 C40.2 R36.1
  Bottom Layer w0.15: v1(51.15,5.7) 51.15,5.25 52,4.4 57.9,4.4 59.2,4.4 59.5,4.7 v1(59.5,5.1)
NetJ6_A5: J6.A5 R37.1 | length 1.9
  Top Layer w0.15: R37.1 71.7,9.4 71.85,9.25 J6.A5
NetJ6_B5: J6.B5 R38.2 | length 1.6
  Top Layer w0.15: R38.2 71.75,12.25 J6.B5
NetL2_1: L2.1 U1.4 | length 1.9
  Top Layer w0.3: L2.1 65.511,7.011 65.9,7.4 U1.4@66.475,7.4
NetL2_2: L2.2 U1.2 | length 1.9
  Top Layer w0.3: L2.2 65.511,8.789 65.9,8.4 U1.2@66.475,8.4
NetL4_1: L4.1 P2.R9 | length 4.5
  Top Layer w0.7: P2.R9 15.04,5.16 16.2,4 L4.1@18.111,4
NetL5_1: L5.1 P2.R10 | length 6.8
  Top Layer w0.7: P2.R10 15.335,2 L5.1@18.111,2
NetLD1_1: LD1.1 R1.2 | length 1.2
  Top Layer w0.15: R1.2 LD1.1
NetLD2_1: LD2.1 R11.1 | length 1.2
  Top Layer w0.15: R11.1 LD2.1
NetP2_L1: P2.L1 R29.1 | length 31.5
  Top Layer w0.15: v1(17.6,16.8) 17.9,16.5 R29.1
  Bottom Layer w0.15: P2.L1 2.77,12.77 3.8,13.8 3.8,18 5.7,19.9 14.5,19.9 v1(17.6,16.8)
NetP2_L3: P2.L3 R30.1 | length 21.5
  Top Layer w0.15: v1(18.1,17.5) R30.1
  Bottom Layer w0.15: P2.L3 3.5,15.065 3.5,18.124 5.576,20.2 14.624,20.2 17.324,17.5 v1(18.1,17.5)
NetP2_R1: P2.R1 R16.1 R19.1 | length 16.5
  Top Layer w0.165: v1(22.75,16.575) 22.575,16.4 22.176,16.4 21.85,16.074 21.85,15.226 22.226,14.85 23.15,14.85 R19.1 23.85,14.85 24.25,14.85 R16.1
  Bottom Layer w0.165: P2.R1 14.365,16.265 14.1,16 14.1,15.524 14.424,15.2 17.4,15.2 19,16.8 21.95,16.8 22.35,16.4 22.575,16.4 v1(22.75,16.575)
NetP2_R2: P2.R2 R15.1 R20.1 | length 16.3
  Top Layer w0.165: v1(22.75,15.925) 22.575,16.1 22.3,16.1 22.15,15.95 22.15,15.35 22.35,15.15 23.15,15.15 R20.1 23.85,15.15 24.25,15.15 R15.1
  Bottom Layer w0.165: P2.R2 12.843,15.338 13.862,15.338 14.3,14.9 15.5,14.9 15.583,14.9 15.84,14.643 16.04,14.643 16.313,14.916 16.513,14.916 16.787,14.643 16.987,14.643 17.244,14.9 17.524,14.9 17.538,14.914 17.724,14.914 17.866,15.056 17.866,15.241 18.212,15.588 19.124,16.5 21.826,16.5 22.226,16.1 22.575,16.1 v1(22.75,15.925)
NetR7_1: R7.1 U4.52 | length 9.1
  Top Layer w0.165: U4.52 52.042,10.058 52.496,10.058 52.502,10.052 52.898,10.052 52.9,10.05 53.326,10.05 53.876,10.6 56.5,10.6 56.85,10.95 60.25,10.95 R7.1
NetR9_1: R9.1 U4.51 | length 9.1
  Top Layer w0.165: U4.51 52.042,9.742 52.496,9.742 52.504,9.75 53.45,9.75 54,10.3 56.624,10.3 56.974,10.65 60.25,10.65 R9.1
NetR15_2: R15.2 U3.1 | length 4.2
  Top Layer w0.165: R15.2 25.95,15.15 26.274,15.15 26.65,14.774 26.65,13.424 26.924,13.15 27.3,13.15 27.4,13.25 U3.1
NetR16_2: R16.2 U3.2 | length 4.2
  Top Layer w0.165: R16.2 25.95,14.85 26.15,14.85 26.35,14.65 26.35,13.3 26.8,12.85 27.3,12.85 27.4,12.75 U3.2
NetR17_2: R17.2 U3.5 | length 2.6
  Top Layer w0.165: R17.2 25.95,11.15 27.3,11.15 27.4,11.25 U3.5
NetR18_2: R18.2 U3.6 | length 2.6
  Top Layer w0.165: R18.2 25.95,10.85 27.3,10.85 27.4,10.75 U3.6
NetR26_2: R26.2 SW1.2 | length 4.3
  Top Layer w0.15: SW1.2 68.425,17.075 68.6,16.9 R26.2
NetR27_1: R27.1 U3.10 | length 2.5
  Top Layer w0.15: R27.1 26.35,8.5 26.6,8.75 U3.10
NetR31_1: R31.1 SW2.2 | length 3.2
  Top Layer w0.15: R31.1@55.6,16.8 56.1,16.8 56.425,16.475 56.425,15.175 56.675,14.925 SW2.2
POE: D1.2 J5.1 J5.2 | length 21.6
  Top Layer w0.4: v1(63.4,7.5) 63.4,6.25 D1.2
  Bottom Layer w0.5: J5.2 J5.1 60.39,14.31 61.3,13.4 61.3,8.3 62.1,7.5 v1(63.4,7.5)
  Bottom Layer w0.7: J5.2 J5.1
QSPI_SCLK: U2.6 U4.56 | length 12.1
  Top Layer w0.15: U4.56 53.076,11.7 54.476,13.1 56.076,13.1 56.476,13.5 62.5,13.5 62.75,13.25 U2.6
QSPI_SD0: U2.5 U4.57 | length 14.9
  Top Layer w0.15: U4.57 53,12.1 53.9,13 53.9,15 54.3,15.4 55.7,15.4 56.3,14.8 56.3,14.2 56.7,13.8 63.25,13.8 U2.5
QSPI_SD1: U2.2 U4.59 | length 19.8
  Top Layer w0.15: U4.59 52.443,12.9 52.889,13.345 v1(52.889,13.4) ; U2.2 66.65,12.75 67.1,13.2 67.1,14.124 66.8,14.424 v1(66.8,14.8)
  Bottom Layer w0.15: v1(52.889,13.4) 53.7,14.211 53.7,15.2 54.1,15.6 66,15.6 v1(66.8,14.8)
QSPI_SD2: U2.3 U4.58 | length 18.6
  Top Layer w0.15: U4.58 52.728,12.5 v1(52.864,12.636) ; v1(66,14.8) 66.8,14 66.8,13.4 66.65,13.25 U2.3
  Bottom Layer w0.15: v1(52.864,12.636) 54,13.772 54,15 54.3,15.3 65.5,15.3 v1(66,14.8)
QSPI_SD3: U2.7 U4.55 | length 12.3
  Top Layer w0.15: U4.55 53.1,11.3 54.6,12.8 56.2,12.8 56.6,13.2 62.3,13.2 62.75,12.75 U2.7
QSPI_SS: R25.1 R26.1 U2.1 U4.60 | length 21.7
  Top Layer w0.15: U4.60 52.2,13.3 52.414,13.514 52.414,13.914 52.6,14.1 v1(52.889,14.1) ; U2.1 67.35,12.25 R25.1 R26.1 v1(67.6,14.1)
  Bottom Layer w0.15: v1(52.889,14.1) 53.4,14.611 53.4,15.4 53.9,15.9 66.4,15.9 67.6,14.7 v1(67.6,14.1)
RUN: J2.10 R31.2 U4.26 | length 33.8
  Top Layer w0.15: v1(43.2,3.1) 43.2,5 42.1,6.1 42.1,8.3 43.1,9.3 U4.26 45.8,9.3 v1(46,9.1) ; v1(52.5,14.9) 53.1,15.5 53.1,16.6 53.3,16.8 R31.2
  Bottom Layer w0.15: v1(43.2,3.1) 43.4,3.3 49.5,3.3 50.23,2.57 J2.10@50.23,1.61 ; v1(46,9.1) 45.5,9.6 45.5,12.2 46,12.7 51.2,12.7 51.575,13.075 51.575,13.569 52.5,14.494 v1(52.5,14.9)
SWCLK: J3.1 U4.24 | length 16.2
  Top Layer w0.15: U4.24 45.6,10.1 v1(46,10.5)
  Bottom Layer w0.15: v1(46,10.5) 46.8,9.7 46.8,9.424 46.8,8.9 47,8.7 47.4,8.7 52.8,8.7 54.7,10.6 57.1,10.6 J3.1
SWDIO: J3.3 U4.25 | length 15
  Top Layer w0.15: U4.25 45.9,9.7 v1(46,9.8)
  Bottom Layer w0.15: v1(46,9.8) 46.5,9.3 46.5,8.776 46.876,8.4 47.276,8.4 52.7,8.4 53.1,8 57.42,8 J3.3
USB_DM: J6.A7 J6.B7 R9.2 | length 16.3
  Top Layer w0.165: R9.2 61.95,10.65 62.55,10.65 63.3,11.4 69,11.4 69.55,10.85 72.025,10.85 v1(72.2,10.675) 72.375,10.85 73.15,10.85 J6.A7 ; J6.B7 73.35,9.85 74.125,9.85 v1(74.3,9.675)
  Bottom Layer w0.165: v1(72.2,10.675) 72.375,10.85 72.75,10.85 73.75,9.85 74.125,9.85 v1(74.3,9.675)
USB_DP: J6.A6 J6.B6 R7.2 | length 16.3
  Top Layer w0.165: R7.2 61.95,10.95 62.426,10.95 63.176,11.7 69.124,11.7 69.674,11.15 72.025,11.15 v1(72.2,11.325) 72.375,11.15 73.15,11.15 J6.B6 ; J6.A6 73.35,10.15 74.125,10.15 v1(74.3,10.325)
  Bottom Layer w0.165: v1(72.2,11.325) 72.375,11.15 72.874,11.15 73.874,10.15 74.125,10.15 v1(74.3,10.325)
VBUS: D2.2 J2.20 J6.A4_B9 J6.B4_A9 | length 4.7
  Top Layer w0.6: v2(71.2,8.1) J6.A4_B9 ; v2(72,13.3) 72.4,12.9 J6.B4_A9
  Top Layer w0.7: D2.2 v2(71.2,8.1)
VC1: J4.1 L4.2 | length 11.2
  Top Layer w0.6: L4.2@19.889,4 19.889,5.111 19.1,5.9 19.1,13.035 J4.1
VC2: J4.2 L5.2 | length 11.6
  Top Layer w0.6: L5.2@19.889,2 20.9,2 21.6,2.7 21.6,6 21.6,9.8 20.375,11.025 J4.2
VREG_AVDD: C39.2 R34.2 U4.46 | length 3.4
  Top Layer w0.25: U4.46 52.2,7.7 52.259,7.641 52.259,6.041 52.5,5.8 C39.2
  Top Layer w0.4: R34.2 C39.2
VREG_FB: C3.2 C4.2 C5.2 C6.2 C14.2 L3.2 U4.6 U4.23 U4.39 U4.50 | length 20.4
  Top Layer w0.25: v1(43.7,10) 44.2,10.5 U4.23 ; v1(48.9,5.2) U4.39 ; U4.6 49.3,14.7 v1(50.3,15.7) ; U4.50 53.3,9.3 53.5,9.1
  Top Layer w0.4: C4.2 v1(43.7,10) ; C6.2 v1(48.9,5.2) ; v1(50.3,15.7) 50.5,15.9 C5.2 ; 53.5,9.1 54.5,8.1 59.3,8.1 59.8,8.6 v1(59.8,9.3) C3.2 ; L3.2 C14.2 v1(57.7,4.9)
VREG_LX: L3.1 U4.48 | length 5.7
  Top Layer w0.25: U4.48 52.6,8.5 53.4,7.7 53.4,6.1 54.111,5.389 L3.1
VREG_PGND: C1.1 C2.1 C3.1 C4.1 C5.1 C6.1 C7.1 C8.1 C9.1 C10.1 C11.1 C12.1 C13.1 C14.1 C15.1 C16.1 C17.1 C18.1 C19.1 C20.1 C21.1 C22.1 C23.1 C24.1 C25.2 C26.2 C27.2 C28.1 C29.1 C30.1 C31.2 C32.1 C33.1 C34.1 C37.1 C38.1 C39.1 C40.1 J1.3 J1.8 J1.13 J1.18 J2.3 J2.8 J2.13 J2.18 J3.2 J5.3 J5.4 J6.A1_B12 J6.B1_A12 LD1.2 LD2.2 R4.1 R8.1 R27.2 R37.2 R38.1 SW1.3 SW2.3 U1.3 U1.9 U2.4 U2.9 U3.3 U3.9 U3.14 U3.16 U3.19 U3.29 U3.48 U4.47 Y1.2 Y1.4 Y2.2 Y2.4 | length 54.8
  Top Layer w0.25: v1(49.8,9.3) 50.1,9.3 51.3,8.1 U4.47 ; U1.3 67.293,7.9 v1(67.318,7.875) ; v1(67.919,8.475) 67.993,8.4 U1.9@69.012,8.4
  Top Layer w0.3: U3.9 29.1,9.25 v1(29.35,9.5) ; U3.3 29.1,12.25 v1(29.35,12) ; U3.48 29.45,13.6 v1(29.7,13.35) ; v1(29.7,7.65) 29.95,7.4 U3.14 ; v1(30.7,7.65) 30.95,7.4 U3.16 ; v1(32.2,7.65) 32.45,7.4 U3.19 ; v1(35,10.05) 35.3,9.75 U3.29
  Top Layer w0.4: v1(23.5,7.75) C30.1 ; C20.1 v1(24.55,13.25) ; v1(24.6,6.75) C18.1 C19.1 ; v1(29.65,3.6) C23.1 ; C21.1 v1(32.4,3.6) C22.1 C29.1 ; v1(39.2,11.2) C27.2 ; Y1.2 40.563,14.837 40.863,14.837 42.363,13.337 42.437,13.337 Y1.4 ; C33.1 C4.1 v1(42,9.3) ; v1(42.6,6.35) C12.1 ; R4.1 C10.1 v1(47.9,2.8) ; v1(48.9,2.8) C6.1 ; v1(50.8,4.1) C9.1@50.8,4.7 ; C39.1 v1(52.8,7.5) ; C14.1 59.3,3.5 v1(60,2.8) ; v1(59.9,12.3) C34.1 ; C40.1 v1(62.3,5.9) C38.1 ; C3.1 v1(62.4,9.3) ; v1(70,9.7) R37.2 ; v1(70,11.7) 70,12 70.3,12.3 R38.1
  Top Layer w0.6: v2(72,14.4) 72.28,14.4 72.98,13.7 J6.B1_A12@73.1,13.7 ; v2(72.3,6.9) 72.7,7.3 J6.A1_B12
  Bottom Layer w0.15: v1(50.8,4.1) 50.9,4 62.4,4 62.6,4.2
  Bottom Layer w0.2: 69.3,5.3 70.5,5.3
  other v1: 19.2,0.8 22.5,1 25,1 41.5,2.6 24,4 18,5.6 39.65,5.85 39.65,6.65 67.318,7.275 67.919,7.275 39.35,7.4 18,7.5 67.919,7.875 39.35,8.2 67.318,8.475 47.3,9.3 48.5,9.3 31.5,9.5 47.3,10.5 48.5,10.5 49.8,10.5 31.5,11.5 33.5,11.5 47.3,11.8 48.5,11.8 49.8,11.8 31.5,13 33.5,13 35,13 64.5,14.5 39.2,14.9 41,16.5 42.5,16.5 39.4,17 75.5,17 34,17.5 47.8,17.5
  other v2: 63.4,4.2 63.4,9.7 63.4,10.5 27.45,15.55 23.8,18.7 23.8,19.5 23.8,20.3
VREG_VIN: C38.2 R10.2 U4.49 | length 12.9
  Top Layer w0.25: U4.49 52.8,8.9 53.9,7.8 53.9,6.3 54.7,5.5 59.1,5.5 C38.2 60.7,8.2 R10.2
VSYS: C1.2 D1.1 D2.1 J2.19 R2.2 R3.1 R5.2 R6.1 U1.5 U1.8 | length 34.3
  Top Layer w0.3: U1.8@68.843,7.875 69.818,7.875 v2(69.918,7.975)
  Top Layer w0.4: v1(39.1,2.9) R5.2 ; R2.2 v1(46.9,5.2)
  Top Layer w0.7: v2(69.918,7.975) v2(69.918,8.775)
  Bottom Layer w0.4: v1(39.1,2.9) 39.5,3.3 42.45,3.3 43.05,3.9 46.9,3.9 ; v1(46.9,5.2) 46.9,3.9 ; v2(67.5,3.4) 50.2,3.4 49.7,3.9 46.9,3.9
  Bottom Layer w0.7: v2@70,8 v2@70,8.8
  other v2: 68.3,3.4 72.9,3.7 73.7,3.7 67.5,4.2 68.3,4.2 72.9,4.5 73.7,4.5
XI: C32.2 R24.1 U3.30 Y2.1 | length 6.8
  Top Layer w0.2: U3.30 37.15,10.25 37.4,10 R24.1 C32.2 37.65,9 37.405,8.755 37.405,6.445 37.65,6.2 Y2.1
XIN: C26.1 R13.2 U4.21 Y1.1 | length 7.2
  Top Layer w0.25: Y1.1 43.35,14.95 43.6,14.7 43.6,12.4 43.4,12.2 C26.1 R13.2 43.1,11.3 U4.21
XO: R23.2 R24.2 U3.31 | length 4.1
  Top Layer w0.2: U3.31 37.25,10.75 37.45,10.55 38.75,10.55 39,10.3 R24.2 R23.2
XOUT: R13.1 R14.2 U4.22 | length 4.6
  Top Layer w0.25: R14.2 R13.1 42,10.8 42.2,10.6 43.5,10.6 43.8,10.9 U4.22
pads on no net: J4.3 J4.4 J6. J6.A8 J6.B8 P2.0 P2.R8 SW1.1 SW1.4 SW2.1 SW2.4 U3.0 U3.7 U3.12 U3.13 U3.18 U3.23 U3.24 U3.26 U3.38 U3.39 U3.40 U3.41 U3.42 U3.46 U3.47 U4.61

## Polygon pours and split planes (outlines as drawn)
VREG_PGND on Bottom Layer "NONET_L01_P-001" (solid, remove dead copper, pour order 1): 75.8,20.9 75.8,14.5 80,14.5 80,6.2 72.5,6.2 72.5,-0.1 17.5,-0.1 17.5,20.9
3V3 on Top Layer "C" (solid, pour order 0): 68.7,8.7 69.3,8.7 69.3,10.4 68.7,11 65.8,11 65.8,8.9 66,8.7 66.6,8.7 66.6,9.4 68.7,9.4
VREG_PGND on Top Layer "NONET_L01_P-001" (solid, remove dead copper, pour order 5): 75.8,15.1 72.5,15.1 72.5,5.9 72.5,0 17.5,0 17.5,21 75.8,21
VSYS on Top Layer "C" (solid, pour order 4): 65.912,7.02 65.9,7.007 65.9,3 68.8,3 68.8,6.1 66.5,6.1 66.512,6.112 66.512,7.02
VSYS on Top Layer "C" (solid, pour order 3): 70.7,5.2 70.7,3 72,3 72.1,2.9 72.1,0.74 72.34,0.5 73.9,0.5 74.1,0.7 74.1,4.6 73.5,5.2
3V3 on Internal Plane 2 (Vcc) (split plane): 79.49,14.151 71.1,14.151 71.061,14.146 71.035,14.135 71.024,14.131 70.993,14.107 70.593,13.707 70.569,13.676 70.563,13.661 70.554,13.639 70.549,13.6 70.549,9.451 66.9,9.451 66.861,9.446 66.824,9.431 66.793,9.407 66.393,9.007 66.369,8.976 66.363,8.961 66.354,8.939 66.349,8.9 66.349,0.51 17.5,0.51 17.5,6.586 19.993,4.093 20.024,4.069 20.061,4.054 20.1,4.049 32.7,4.049 32.739,4.054 32.776,4.069 32.807,4.093 33.107,4.393 33.131,4.424 33.146,4.461 33.151,4.5 33.151,6.2 33.146,6.239 33.131,6.276 33.107,6.307 32.807,6.607 32.776,6.631 32.761,6.637 32.739,6.646 32.7,6.651 28.413,6.651 27.051,8.013 27.051,16.8 27.046,16.839 27.031,16.876 27.007,16.907 25.907,18.007 25.876,18.031 25.861,18.037 25.839,18.046 25.8,18.051 24.5,18.051 24.461,18.046 24.439,18.037 24.424,18.031 24.393,18.007 22.337,15.951 19.4,15.951 19.361,15.946 19.324,15.931 19.293,15.907 18.693,15.307 18.669,15.276 18.654,15.239 18.649,15.2 18.649,12.363 18.437,12.151 17.5,12.151 17.5,20.49 79.49,20.49
NetC30_2 on Internal Plane 2 (Vcc) (split plane): 22.949,13.337 22.949,7.451 20.263,7.451 19.451,8.263 19.451,9.6 19.446,9.639 19.431,9.676 19.407,9.707 18.807,10.307 18.776,10.331 18.739,10.346 18.7,10.351 17.5,10.351 17.5,10.4 14.314,10.4 14.151,10.563 14.151,11.637 14.363,11.849 18.5,11.849 18.539,11.854 18.561,11.863 18.576,11.869 18.607,11.893 18.907,12.193 18.931,12.224 18.946,12.261 18.951,12.3 18.951,13.449 22.837,13.449
3V3A on Internal Plane 2 (Vcc) (split plane): 26.749,16.737 26.749,7.95 26.754,7.911 26.769,7.874 26.793,7.843 28.243,6.393 28.274,6.369 28.311,6.354 28.35,6.349 32.637,6.349 32.849,6.137 32.849,4.563 32.637,4.351 20.163,4.351 17.5,7.014 17.5,10.049 18.637,10.049 19.149,9.537 19.149,8.2 19.154,8.161 19.169,8.124 19.193,8.093 20.093,7.193 20.124,7.169 20.161,7.154 20.2,7.149 23.1,7.149 23.139,7.154 23.176,7.169 23.207,7.193 23.231,7.224 23.246,7.261 23.251,7.3 23.251,13.4 23.246,13.439 23.231,13.476 23.207,13.507 23.007,13.707 22.976,13.731 22.961,13.737 22.939,13.746 22.9,13.751 18.951,13.751 18.951,15.137 19.463,15.649 22.4,15.649 22.439,15.654 22.461,15.663 22.476,15.669 22.507,15.693 24.563,17.749 25.737,17.749
VBUS on Internal Plane 2 (Vcc) (split plane): 79.49,0.51 74.551,0.51 74.551,4.7 74.546,4.739 74.531,4.776 74.507,4.807 74.007,5.307 73.976,5.331 73.961,5.337 73.939,5.346 73.9,5.351 71.963,5.351 70.851,6.463 70.851,9.3 70.851,13.537 71.163,13.849 79.49,13.849
VREG_FB on Internal Plane 2 (Vcc) (split plane): 52.193,15.193 52.224,15.169 52.261,15.154 52.3,15.149 59.337,15.149 60.349,14.137 60.349,6.263 58.737,4.651 55.063,4.651 53.707,6.007 53.676,6.031 53.661,6.037 53.639,6.046 53.6,6.051 50.9,6.051 50.861,6.046 50.824,6.031 50.793,6.007 49.737,4.951 48.763,4.951 48.551,5.163 48.551,5.6 48.546,5.639 48.531,5.676 48.507,5.707 48.207,6.007 48.176,6.031 48.139,6.046 48.1,6.051 44.663,6.051 43.351,7.363 43.351,10.137 43.563,10.349 44.437,10.349 44.749,10.037 44.749,8.2 44.754,8.161 44.769,8.124 44.793,8.093 45.193,7.693 45.224,7.669 45.239,7.663 45.261,7.654 45.3,7.649 52.9,7.649 52.939,7.654 52.961,7.663 52.976,7.669 53.007,7.693 53.407,8.093 53.431,8.124 53.435,8.135 53.446,8.161 53.451,8.2 53.451,10.8 53.446,10.839 53.431,10.876 53.407,10.907 53.107,11.207 53.076,11.231 53.061,11.237 53.039,11.246 53,11.251 51.763,11.251 50.051,12.963 50.051,15.937 50.363,16.249 51.137,16.249
VSYS on Internal Plane 2 (Vcc) (split plane): 70.549,6.4 70.554,6.361 70.563,6.339 70.569,6.324 70.593,6.293 71.793,5.093 71.824,5.069 71.861,5.054 71.9,5.049 73.837,5.049 74.249,4.637 74.249,0.51 66.651,0.51 66.651,8.837 66.963,9.149 70.549,9.149
VREG_PGND on Internal Plane 1 (Gnd) (split plane): 79.49,0.51 17.5,0.51 17.5,20.49 79.49,20.49

## Keep-outs
Keep-Out Layer:
  the board outline again, w0.2
  text ".Layer_Name" at 9.398,25 h1.52

## Other copper
Top Layer:
  region net VREG_PGND: 63.6,9.3 64.078,9.778 64.968,9.778 64.968,11.022 63.422,11.022 63,10.6 63,9.6 63.3,9.3
  region net 3V3: 30.15,16.4 30.5,16.75 30.5,17.85 30.14,18.21 27.805,18.21 27.805,16.595 28,16.4
  region net 3V3A: 24.75,16.4 24.4,16.75 24.4,17.85 24.76,18.21 27.095,18.21 27.095,16.595 26.9,16.4
  text ".Layer_Name" at 9.398,25 h1.52
Bottom Layer:
  region net CGND: 76.5,3.5 79.5,3.5 79.5,17.5 76.5,17.5
  region net VSYS: 67.3,2.8 67.1,3 67.1,4.7 67.3,4.9 73.8,4.9 74.1,4.6 74.1,0.76 73.74,0.4 72.44,0.4 72.1,0.74 72.1,2.4 71.7,2.8
  region net 3V3A: 24.75,16.4 24.4,16.75 24.4,17.55 24.75,17.9 25.55,17.9 25.9,17.55 25.9,16.75 25.55,16.4
  region net 3V3: 29.35,16.4 29,16.75 29,17.55 29.35,17.9 30.15,17.9 30.5,17.55 30.5,16.75 30.15,16.4
  text ".Layer_Name" at 9.398,25 h1.52
Internal Plane 1 (Gnd) (plane layer: these items are gaps in the copper):
  pour cut-out: 17.5,0 17.5,21 0,21 0,0
  text ".Layer_Name" at 9.4,25 h1.52
Internal Plane 2 (Vcc) (plane layer: these items are gaps in the copper):
  pour cut-out: 17.5,11.9 14.1,11.9 14.1,10.4 17.5,10.4 17.5,0 0,0 0,21 17.5,21
  pour cut-out: 39.7,12.8 43.3,12.8 43.3,15.6 39.7,15.6
  pour cut-out: 37.7,5.6 41.3,5.6 41.3,8.4 37.7,8.4
  lines w0.3: 17.1,10 14.5,10 14,10.5 14,11.7 14.3,12 18.5,12 18.8,12.3 18.8,15.2 19.4,15.8 22.4,15.8 24.5,17.9 25.8,17.9 26.9,16.8 26.9,7.95 28.35,6.5 32.7,6.5 33,6.2 33,4.5 32.7,4.2 20.1,4.2 17.1,7.2 17.1,10.2 18.7,10.2 19.3,9.6 19.3,8.2 20.2,7.3 23.1,7.3 23.1,13.4 22.9,13.6 18.8,13.6 ; 66.5,0 66.5,8.9 66.9,9.3 68.7,9.3 70.7,9.3 ; 74.4,0 74.4,4.7 73.9,5.2 71.9,5.2 70.7,6.4 70.7,9.3 ; 80,14 71.1,14 70.7,13.6 70.7,9.3 ; 43.2,7.3 43.2,10.2 43.5,10.5 44.5,10.5 44.9,10.1 44.9,8.2 45.3,7.8 52.9,7.8 53.3,8.2 53.3,10.8 53,11.1 51.7,11.1 49.9,12.9 49.9,16 50.3,16.4 51.2,16.4 52.3,15.3 59.4,15.3 60.5,14.2 60.5,6.2 58.8,4.5 57.4,4.5 55,4.5 53.6,5.9 50.9,5.9 49.8,4.8 48.7,4.8 48.4,5.1 48.4,5.6 48.1,5.9 44.6,5.9 43.2,7.3
  text ".Layer_Name" at 9.4,25 h1.52

## Silkscreen, mask and mechanical layers (free items; w line width, h text height)
Top Overlay:
  region: 45.5,7.5 51.5,7.5 51.5,13.5 45.5,13.5 45.5,10.5 46.4,10.5 46.4,12.6 50.6,12.6 50.6,8.4 46.4,8.4 46.4,10.5 45.5,10.5
  text ".Layer_Name" at 9.398,25.032 h1.52
  text "20" at 25.514,20.5 h1.2 r270
  text "1" at 76.9,20.5 h1.2 r270
  text "Rev 1.0" at 0.8,19 h1.5
  text "RUN" at 58.5,17.75 h1
  text "BOOTSEL" at 63.25,17.75 h1
  text "W5500-EVB-Pico2" at 33.5,17.25 h1.5
  text "21" at 25.4,1.7 h1.2 r270
  text "40" at 76.814,1.7 h1.2 r270
  text "Made by WIZnet" at 0.7,0.1 h1.5
Bottom Overlay:
  drawing of 48 lines, arcs and shapes, not listed
  text ".Layer_Name" at 9.398,25 h1.52
  text "GP1" at 72.832,15.968 h1.2 r270
  text "GP9" at 47.332,15.843 h1.2 r270
  text "GP8" at 49.832,15.84 h1.2 r270
  text "GP7" at 52.582,15.84 h1.2 r270
  text "GP6" at 55.082,15.83 h1.2 r270
  text "GP3" at 65.332,15.839 h1.2 r270
  text "GP2" at 67.832,15.847 h1.2 r270
  text "GP0" at 75.332,15.846 h1.2 r270
  text "GP5" at 60.082,15.825 h1.2 r270
  text "GP4" at 62.582,15.817 h1.2 r270
  text "GND" at 32.332,15.61 h1.2 r270
  text "GND" at 44.832,15.61 h1.2 r270
  text "GND" at 57.582,15.61 h1.2 r270
  text "GND" at 70.332,15.61 h1.2 r270
  text "GP11" at 39.832,15.371 h1.2 r270
  text "GP12" at 37.082,15.25 h1.2 r270
  text "GP10" at 42.332,15.249 h1.2 r270
  text "GP15" at 27.082,15.228 h1.2 r270
  text "GP13" at 34.832,15.242 h1.2 r270
  text "GP14" at 29.582,15.22 h1.2 r270
  text "SWCLK" at 64,11.25 h1.2
  text "GND" at 64,8.75 h1.2
  text "Connected to W5500" at 39.75,7.014 h1.2
  text "SWDIO" at 64,6.25 h1.2
  text "AGND" at 57.114,3 h1.2 r270
  text "VSYS" at 72.014,3 h1.2 r270
  text "GP16" at 27.014,2.95 h1.2 r270
  text "GP17" at 29.514,2.95 h1.2 r270
  text "GND" at 32.014,2.95 h1.2 r270
  text "GP18" at 34.514,2.95 h1.2 r270
  text "GP19" at 37.264,2.95 h1.2 r270
  text "GP20" at 39.764,2.95 h1.2 r270
  text "GP21" at 42.264,2.95 h1.2 r270
  text "GND" at 44.764,2.95 h1.2 r270
  text "GP22" at 47.264,2.95 h1.2 r270
  text "RUN" at 49.764,2.95 h1.2 r270
  text "ADC_ / VREF" at 62,2.95 h1.2 r270
  text "3V3" at 65.014,2.95 h1.2 r270
  text "3V3_EN" at 67.712,2.95 h1.2 r270
  text "GND" at 70.014,2.95 h1.2 r270
  text "VBUS" at 75.264,2.95 h1.2 r270
  text "GP26" at 52.4,2.9 h1.2 r270
  text "GP27" at 54.9,2.9 h1.2 r270
  text "GP28" at 59.9,2.9 h1.2 r270
Top Paste:
  text ".Layer_Name" at 9.398,25 h1.52
Bottom Paste:
  text ".Layer_Name" at 9.398,25 h1.52
Top Solder:
  text ".Layer_Name" at 9.398,25 h1.52
Bottom Solder:
  text ".Layer_Name" at 9.398,25 h1.52
Drill Guide:
  text ".Layer_Name" at 9.398,25 h1.52
Mechanical 2:
  lines w0.127: 83.5,13 127,13 ; 82.5,1.775 ccw(c83.211,1.775) 83.211,1.064 127.389,1.064 ccw(c127.389,1.775) 128.1,1.775 128.1,19.903 ccw(c127.389,19.903) 127.389,20.614 83.211,20.614 ccw(c83.211,19.903) 82.5,19.903 82.5,1.775
  lines w0.2: 0,0 0,21 80,21 80,0 0,0
  text "BOARD NAME : W5500-EVB-Pico2" at 0,36.176 h1.52
  text "VERSION : V100" at 0,33.382 h1.52
  text "SIZE : 21mmX80mmX1.6T" at 0,30.588 h1.52
  text "GERBER DATE : 2024. 05. 31." at 0,27.794 h1.52
  text "LAYER :" at 0,25 h1.52
  text "Layer Stack Up Detail for:" at 83.9,18.5 h1.02
  text "W5500-EVB-Pico2_V100.PcbDoc" at 84,16 h1.2
  text "Layer Name : 4L  1.6T" at 83.973,14.018 h1.02
  text "100 Ohm" at 116,14 h1.02
  text "01.Top Layer" at 84,10 h1.52
  text "0.165 / 0.135" at 112,10 h1.52
  text "02.Internal Plane 1 (Gnd)" at 84,7.5 h1.52
  text "03.Internal Plane 2 (Vcc)" at 84,5 h1.52
  text "02.Bottom Layer" at 84,2.5 h1.52
  text "0.165 / 0.135" at 112,2.5 h1.52
  text "KS Technology artwork" at 82.5,-3 h5.08
Drill Drawing:
  text ".Layer_Name" at 9.398,25 h1.52
  text ".Legend" at 82.7,22 h1.02

## Dimensions
80,-1 to 0,-1 on Mechanical 2
-0.5,0 to -0.5,21 on Mechanical 2

## Text inside footprints (layer, text, board x,y; h text height)
J6: Top Overlay "B1" at 72.45,13.362 h0.6 r90; Top Overlay "A1" at 72.45,6.93 h0.6 r90